# Altium PCB PCB-MAIN.PcbDoc (part 6 of 6)
Units mm, origin at the board's own origin, x right, y up, seen from the top; angles counter-clockwise.
Board outline 110 x 75 mm, 8 copper layers (F.Cu, In1.Cu, In2.Cu, In3.Cu, In4.Cu, In5.Cu, In6.Cu, B.Cu); 251 components, 185 nets, 1143 pads, 853 vias.
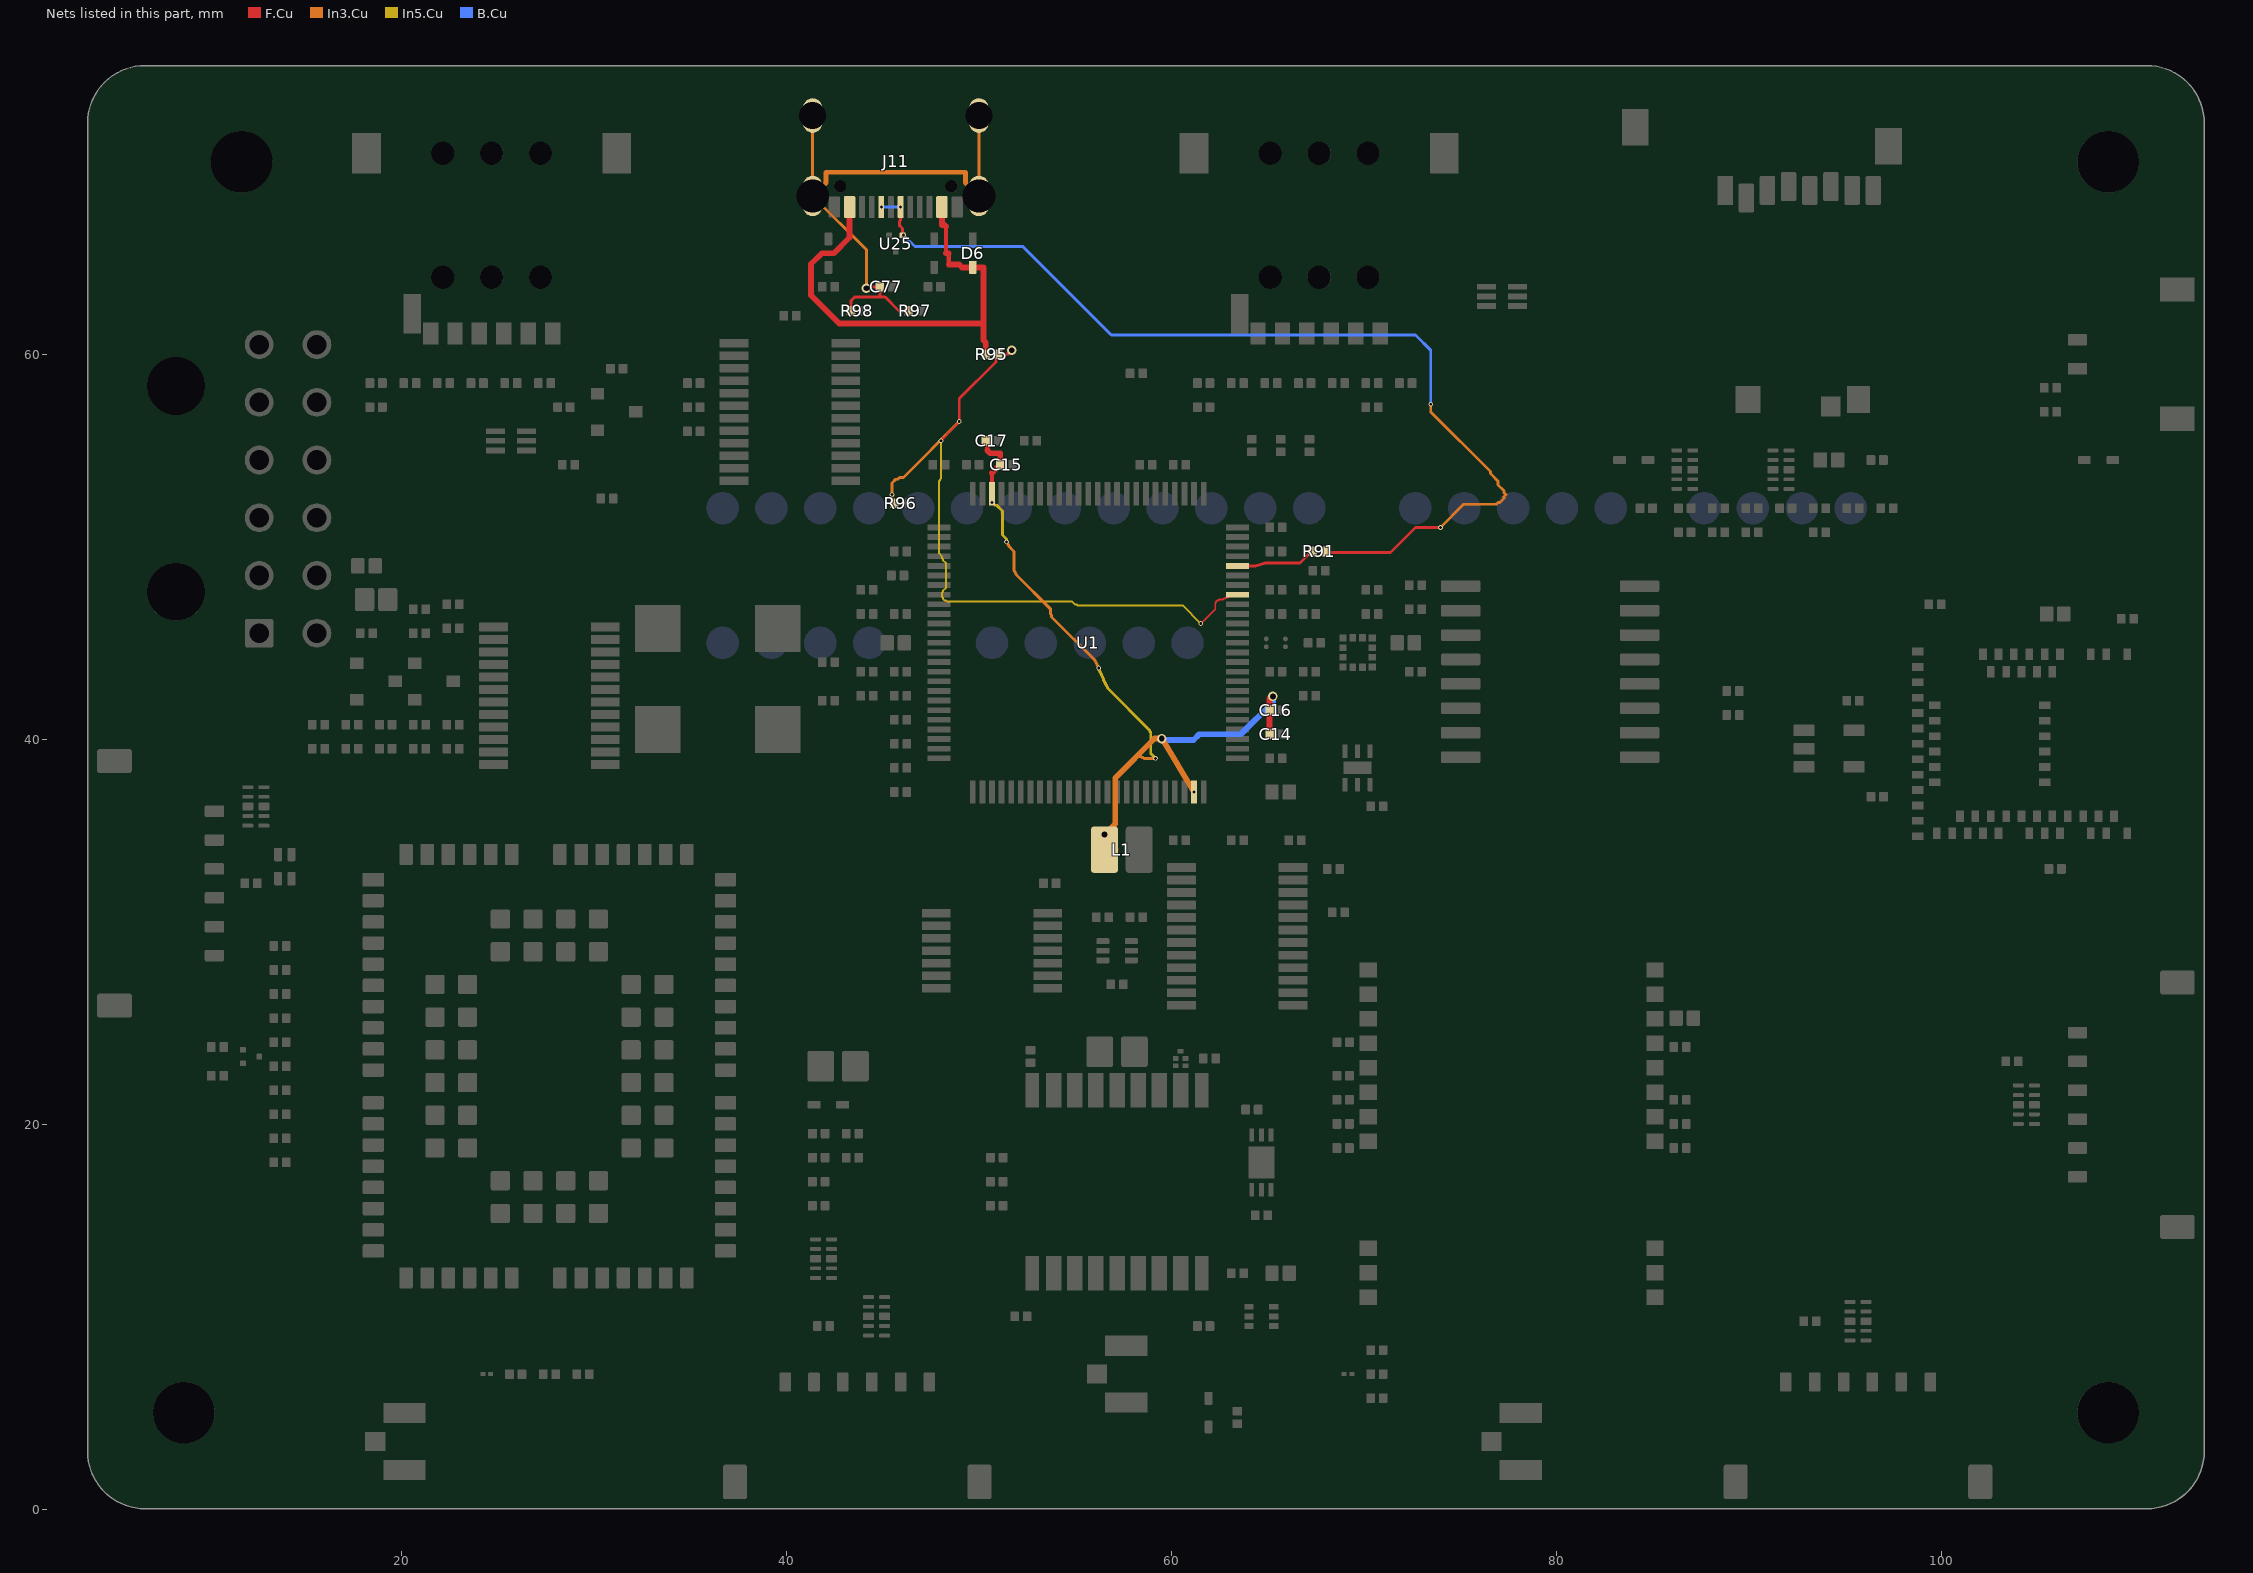
[diagram p11: the nets of this part, all layers, seen from the top]

## Via types
v1: diameter 0.5, hole 0.3, F.Cu to B.Cu, tented both sides, 579 vias
v2: diameter 0.25, hole 0.15, F.Cu to B.Cu, tented both sides, 274 vias

## Nets (pads, with @x,y where several pads share a name; then routed paths per layer and width w, separated by ;. In a path a pad name is that pad's centre, name@x,y a point inside that pad or via, vN(x,y) a via of type N, cw(c..) or ccw(c..) an arc to the next point about the centre after c; other vN are vias at no path point) (continued)
USB_DP_CONN: J11.A6 J11.B6 R91.2 U25.1 | length 52.2
  F.Cu w0.15: R91.2@68.085,49.725 71.385,49.725 72.685,51.025 v2(73.985,51.025)
  F.Cu w0.154: v2(45.935,67.67) 45.935,66.975 45.868,66.908 45.868,66.725 46.035,66.558 U25.1@46.035,66.2
  In3.Cu w0.15: v2(73.485,57.425) 73.485,57.025 76.585,53.925 76.585,53.825 76.985,53.425 76.985,53.225 77.285,52.925 77.285,52.825 77.385,52.725 77.285,52.625 77.285,52.525 77.085,52.325 76.985,52.325 76.885,52.225 75.185,52.225 v2(73.985,51.025)
  B.Cu w0.15: v2(46.085,66.225) 46.685,65.625 52.285,65.625 56.885,61.025 72.685,61.025 73.485,60.225 v2(73.485,57.425)
  B.Cu w0.154: v2(44.935,67.67) v2(45.935,67.67)
USB_DP_U1: R91.1 U1.71 | length 4.2
  F.Cu w0.154: U1.71@63.435,49.025 64.385,49.025 64.885,49.175 66.685,49.175 67.135,49.625 R91.1@67.36,49.775
USB_SHIELD: C77.1 J11.SHIELD R97.1 R98.1 | length 29.8
  F.Cu w0.15: R98.1@43.36,62.275 43.36,62.802 43.556,62.998 44.86,62.998 ; v1(44.159,63.449) 44.282,63.449 44.358,63.525 C77.1@44.86,63.525 44.86,62.998 ; R97.1@46.36,62.275 45.858,62.275 45.135,62.998 44.86,62.998
  In3.Cu w0.15: J11.SHIELD@41.365,72.425 J11.SHIELD@41.365,68.245 44.159,65.451 v1(44.159,63.449) ; J11.SHIELD@50.005,68.245 J11.SHIELD@50.005,72.425
  In3.Cu w0.25: J11.SHIELD@41.365,68.245 42.065,68.945 42.065,69.475 49.305,69.475 49.305,68.945 J11.SHIELD@50.005,68.245
USB_VBUS_CONN: D6.1 J11.A4 J11.A9 J11.B4 J11.B9 R95.1 | length 25.1
  F.Cu w0.225: 48.297,65.275 48.297,66.66 ; 48.435,64.683 48.435,65.275
  F.Cu w0.3: J11.B4@43.285,67.67 43.285,66.082 42.478,65.275 41.846,65.275 41.283,64.712 41.283,63.089 42.747,61.624 50.237,61.624 ; J11.B9@48.085,67.67 48.085,66.743 48.215,66.743 48.297,66.66 ; 48.297,65.275 48.435,65.275 ; 48.435,64.683 48.985,64.683 49.133,64.535 D6.1@49.685,64.535 50.237,64.535 50.237,61.624 ; R95.1@50.36,60.025 50.36,60.627 50.237,60.75 50.237,61.624
USB_VBUS_SENSE: R95.2 R96.1 U1.68 | length 37
  F.Cu w0.1: v2(48.035,55.525) 48.335,55.825 48.335,55.875 v2@48.935,56.475 ; v2(61.535,46.025) 62.285,46.775 62.285,47.075 62.335,47.125 62.335,47.175 62.385,47.225 62.435,47.225 62.485,47.275 62.685,47.275 62.735,47.325 62.785,47.325 62.835,47.375 62.935,47.375 U1.68@63.085,47.525
  F.Cu w0.15: v2(45.485,52.725) 45.485,52.525 45.585,52.425 R96.1@45.585,52.325 ; v2(48.985,56.525) 48.985,57.725 50.885,59.625 50.885,59.825 R95.2@50.985,59.925 ; R95.2@51.01,60.025 51.512,60.025 v1(51.712,60.225)
  In3.Cu w0.15: v2(45.485,52.725) 45.485,53.325 45.685,53.525 45.785,53.525 45.885,53.625 46.085,53.625 v2(48.985,56.525)
  In5.Cu w0.1: v2(48.035,55.525) 48.035,53.575 47.985,53.525 47.985,53.475 47.935,53.425 47.935,49.675 48.085,49.525 48.085,49.425 48.135,49.375 48.135,49.325 48.285,49.175 48.285,47.875 48.135,47.725 48.135,47.675 48.085,47.625 48.085,47.425 48.135,47.375 48.135,47.325 48.235,47.225 48.285,47.225 48.335,47.175 54.835,47.175 54.985,47.025 55.085,47.025 55.135,46.975 60.585,46.975 v2(61.535,46.025)
VCORE_1V1: C14.1 C15.1 C16.1 C17.1 L1.2 U1.49 U1.98 | length 41.4
  F.Cu w0.225: C17.1@50.36,55.525 50.434,55.451 50.434,55.028 ; U1.98@50.685,52.775 50.685,53.85
  F.Cu w0.3: 50.434,55.028 50.585,54.877 51.11,54.877 C15.1@51.11,54.275 50.685,53.85 ; v1(56.533,35.06) 56.533,34.275 L1.2@57.11,34.275 ; C14.1@65.11,40.275 C16.1@65.11,41.525 65.11,42.127 65.166,42.127 v1(65.281,42.242)
  In3.Cu w0.15: v2(51.435,50.275) 51.485,50.225 51.485,50.175 51.535,50.125 51.535,50.075 51.835,49.775 51.835,48.775 51.885,48.725 51.885,48.675 51.935,48.625 51.935,48.575 53.735,46.775 53.735,46.525 53.785,46.475 53.785,46.375 56.035,44.125 56.035,44.075 56.085,44.025 56.085,43.975 56.135,43.925 56.135,43.875 56.185,43.825 56.185,43.775 v2(56.235,43.725) ; 58.285,39.175 58.335,39.125 58.435,39.125 58.485,39.075 58.535,39.075 58.585,39.025 v2(59.185,39.025)
  In3.Cu w0.3: v1(56.533,35.06) 57.085,35.612 57.085,38.002 59.132,40.049 v1(59.509,40.049) v2(61.185,37.275)
  In5.Cu w0.15: v2(50.685,52.325) 50.835,52.175 50.935,52.175 51.235,51.875 51.235,50.625 51.435,50.425 v2(51.435,50.275) ; v2(56.235,43.725) 56.235,43.625 56.285,43.575 56.285,43.525 56.335,43.475 56.335,43.425 56.385,43.375 56.385,43.325 56.435,43.275 56.435,43.225 56.485,43.175 56.485,43.075 56.535,43.025 56.535,42.975 56.585,42.925 56.585,42.875 56.635,42.825 56.635,42.775 56.685,42.725 56.685,42.675 58.885,40.475 58.885,40.425 58.935,40.375 58.935,39.275 v2(59.185,39.025)
  B.Cu w0.3: v1(59.509,40.049) 59.583,39.974 61.16,39.974 61.457,40.272 63.613,40.272 65.281,41.94 v1(65.281,42.242)
pads on no net: D1.Un1 D1.Un2 D2.Un1 D2.Un2 H1.Un1 H2.Un1 H3.Un1 H4.Un1 J6.5 J6.Un1 J6.Un2 J6.Un3 J6.Un4 J6.Un5 J6.Un6 J7.5 J7.Un1 J7.Un2 J7.Un3 J7.Un4 J7.Un5 J7.Un6 J8.Un1 J8.Un2 J8.Un3 J9.Un1 J9.Un2 J9.Un3 J10.Un1 J10.Un2 J10.Un3 J11.A8 J11.B8 J11.Un1 J11.Un2 J13.Un1 J13.Un2 J_MIC1.Un1 J_MIC1.Un2 J_MIC2.Un1 J_MIC2.Un2 J_MIC3.Un1 J_MIC3.Un2 J_MIC4.Un1 J_MIC4.Un2 J_PWR.Un1 J_PWR.Un2 Q1.Un1 Q1.Un2 Q1.Un3 Q2.Un1 Q2.Un2 Q2.Un3 Q3.Un1 Q3.Un2 Q3.Un3 U1.9 U1.12 U1.13 U1.18 U1.23 U1.32 U1.36 U1.69 U1.84 U1.88 U1.89 U1.90 U1.91 U2.4 U2.5 U2.6 U2.11 U2.12 U2.13 U2.14 U3.5 U3.11 U4.2 U4.EP U6.1 U7.9 U7.10 U8.1 U8.2 U8.4 U8.5 U8.6 U8.7 U8.11 U8.12 U8.13 U8.14 U8.16 U8.18 U8.19 U8.21 U8.24 U8.25 U8.26 U8.27 U8.28 U8.36 U8.37 U8.38 U8.40 U8.41 U8.42 U8.49 U8.51 U8.56 U8.57 U8.63 U8.64 U8.65 U8.66 U8.76 U8.77 U8.78 U8.83 U8.84 U8.85 U8.86 U8.87 U8.88 U8.92 U8.93 U8.94 U8.95 U8.96 U8.97 U8.98 U8.99 U9.5 U9.6 U9.9 U9.15 U9.18 U10.8 U11.3 U11.4 U11.5 U11.6 U11.7 U11.8 U11.9 U11.10 U11.11 U11.12 U11.13 U11.14 U11.16 U11.17 U11.18 U11.19 U11.20 U11.21 U11.23 U11.25 U11.26 U11.27 U11.29 U11.31 U11.32 U11.34 U11.35 U11.36 U11.37 U11.38 U11.41 U11.42 U11.43 U11.44 U11.45 U11.46 U11.47 U11.48 U11.49 U11.50 U11.52 U11.54 U11.56 U11.57 U11.58 U11.59 U11.60 U11.61 U13.3 U16.9 U16.10 U16.18 U17.11 U19.6 U19.7 U19.9 U19.10 U19.Un1 U19.Un2 U20.6 U20.7 U20.9 U20.10 U20.Un1 U20.Un2 U21.6 U21.7 U21.9 U21.10 U21.Un1 U21.Un2 U22.6 U22.7 U22.9 U22.10 U22.Un1 U22.Un2 U23.6 U23.7 U23.9 U23.10 U23.Un1 U23.Un2 U24.5 U24.6 U24.7 U24.9 U24.10 U24.Un1 U24.Un2 U27.6 U27.7 U27.9 U27.10 U27.Un1 U27.Un2

## Polygon pours and split planes (outlines as drawn)
GND_MODEM on In1.Cu "In1.Cu-GND_MODEM" (solid, remove dead copper, pour order 8): 13.685,41.025 39.685,41.025 39.685,1.025 13.685,1.025
GND_DIGITAL on In1.Cu "In1.Cu-GND_DIGITAL" (solid, remove dead copper, pour order 5): 113.035,0.675 39.885,0.675 39.885,41.225 13.485,41.225 13.485,0.675 4.335,0.675 4.335,74.375 113.035,74.375
GND_MIC on In2.Cu "In2.Cu-GND_MIC" (solid, remove dead copper, pour order 9): 113.035,45.225 97.985,45.225 97.985,34.325 113.035,34.325 113.035,0.675 89.385,0.675 89.385,29.225 66.885,29.225 66.885,24.225 47.485,24.225 47.485,0.675 39.885,0.675 39.885,41.225 13.485,41.225 13.485,0.675 4.335,0.675 4.335,74.375 113.035,74.375
GND_DIGITAL on In4.Cu "In4.Cu-GND_DIGITAL" (solid, remove dead copper, pour order 10): 113.035,0.675 113.035,74.375 4.335,74.375 4.335,0.675 13.485,0.675 13.485,41.225 39.885,41.225 39.885,0.675
GND_MODEM on In4.Cu "In4.Cu-GND_MODEM-1" (solid, remove dead copper, pour order 7): 299 vertices, not listed, extent 8.612,0.675 79.488,72.125
GND_MODEM on In4.Cu "In4.Cu-GND_MODEM" (solid, remove dead copper, pour order 6): 59.694,45.365 59.645,45.042 59.665,44.808 59.73,44.582 59.838,44.373 59.985,44.189 60.164,44.037 60.37,43.923 60.594,43.852 60.828,43.825 61.062,43.845 61.288,43.91 61.497,44.018 61.681,44.165 61.833,44.344 61.947,44.55 62.018,44.774 62.045,45.042 61.988,45.39 61.849,45.681 61.619,45.941 61.395,46.091 61.062,46.205 60.744,46.221 60.461,46.161 60.304,46.378 60.044,46.51 59.81,46.516 59.591,46.433 59.424,46.276 59.331,46.083 59.312,45.883 59.363,45.68 59.498,45.489
GND_DIGITAL on In6.Cu "In6.Cu-GND_DIGITAL" (solid, remove dead copper, pour order 11): 113.035,0.675 113.035,74.375 4.335,74.375 4.335,0.675 13.485,0.675 13.485,41.225 39.885,41.225 39.885,0.675

## Keep-outs
F.Cu:
  region: 109.88,45.034 109.88,34.519 113.69,34.519 113.69,45.034
  region: 108.661,42.088 108.661,40.462 109.906,40.462 109.906,42.088
  region: 9.078,9.016 9.467,8.958 9.849,8.862 10.22,8.73 10.575,8.562 10.913,8.359 11.229,8.125 11.52,7.86 11.785,7.569 12.019,7.253 12.222,6.915 12.39,6.56 12.522,6.189 12.618,5.807 12.676,5.418 12.695,5.025 12.676,4.632 12.618,4.243 12.522,3.861 12.39,3.49 12.222,3.135 12.019,2.797 11.785,2.481 11.52,2.19 11.229,1.925 10.913,1.691 10.575,1.488 10.22,1.32 9.849,1.188 9.467,1.092 9.078,1.034 8.685,1.015 8.292,1.034 7.903,1.092 7.521,1.188 7.15,1.32 6.795,1.488 6.457,1.691 6.141,1.925 5.85,2.19 5.585,2.481 5.351,2.797 5.148,3.135 4.98,3.49 4.848,3.861 4.752,4.243 4.694,4.632 4.675,5.025 4.694,5.418 4.752,5.807 4.848,6.189 4.98,6.56 5.148,6.915 5.351,7.253 5.585,7.569 5.85,7.86 6.141,8.125 6.457,8.359 6.795,8.562 7.15,8.73 7.521,8.862 7.903,8.958 8.292,9.016 8.685,9.035
  region: 109.078,9.016 109.467,8.958 109.849,8.862 110.22,8.73 110.575,8.562 110.913,8.359 111.229,8.125 111.52,7.86 111.785,7.569 112.019,7.253 112.222,6.915 112.39,6.56 112.522,6.189 112.618,5.807 112.676,5.418 112.695,5.025 112.676,4.632 112.618,4.243 112.522,3.861 112.39,3.49 112.222,3.135 112.019,2.797 111.785,2.481 111.52,2.19 111.229,1.925 110.913,1.691 110.575,1.488 110.22,1.32 109.849,1.188 109.467,1.092 109.078,1.034 108.685,1.015 108.292,1.034 107.903,1.092 107.521,1.188 107.15,1.32 106.795,1.488 106.457,1.691 106.141,1.925 105.849,2.19 105.585,2.481 105.351,2.797 105.148,3.135 104.98,3.49 104.848,3.861 104.752,4.243 104.694,4.632 104.675,5.025 104.694,5.418 104.752,5.807 104.848,6.189 104.98,6.56 105.148,6.915 105.351,7.253 105.585,7.569 105.849,7.86 106.141,8.125 106.457,8.359 106.795,8.562 107.15,8.73 107.521,8.862 107.903,8.958 108.292,9.016 108.685,9.035
  region: 109.078,74.016 109.467,73.958 109.849,73.862 110.22,73.73 110.575,73.562 110.913,73.359 111.229,73.125 111.52,72.86 111.785,72.569 112.019,72.253 112.222,71.915 112.39,71.56 112.522,71.189 112.618,70.807 112.676,70.418 112.695,70.025 112.676,69.632 112.618,69.243 112.522,68.861 112.39,68.49 112.222,68.135 112.019,67.797 111.785,67.481 111.52,67.19 111.229,66.925 110.913,66.691 110.575,66.488 110.22,66.32 109.849,66.188 109.467,66.092 109.078,66.034 108.685,66.015 108.292,66.034 107.903,66.092 107.521,66.188 107.15,66.32 106.795,66.488 106.457,66.691 106.141,66.925 105.849,67.19 105.585,67.481 105.351,67.797 105.148,68.135 104.98,68.49 104.848,68.861 104.752,69.243 104.694,69.632 104.675,70.025 104.694,70.418 104.752,70.807 104.848,71.189 104.98,71.56 105.148,71.915 105.351,72.253 105.585,72.569 105.849,72.86 106.141,73.125 106.457,73.359 106.795,73.562 107.15,73.73 107.521,73.862 107.903,73.958 108.292,74.016 108.685,74.035
  region: 12.078,74.016 12.467,73.958 12.849,73.862 13.22,73.73 13.575,73.562 13.913,73.359 14.229,73.125 14.52,72.86 14.785,72.569 15.019,72.253 15.222,71.915 15.39,71.56 15.522,71.189 15.618,70.807 15.676,70.418 15.695,70.025 15.676,69.632 15.618,69.243 15.522,68.861 15.39,68.49 15.222,68.135 15.019,67.797 14.785,67.481 14.52,67.19 14.229,66.925 13.913,66.691 13.575,66.488 13.22,66.32 12.849,66.188 12.467,66.092 12.078,66.034 11.685,66.015 11.292,66.034 10.903,66.092 10.521,66.188 10.15,66.32 9.795,66.488 9.457,66.691 9.141,66.925 8.849,67.19 8.585,67.481 8.351,67.797 8.148,68.135 7.98,68.49 7.848,68.861 7.752,69.243 7.694,69.632 7.675,70.025 7.694,70.418 7.752,70.807 7.848,71.189 7.98,71.56 8.148,71.915 8.351,72.253 8.585,72.569 8.849,72.86 9.141,73.125 9.457,73.359 9.795,73.562 10.15,73.73 10.521,73.862 10.903,73.958 11.292,74.016 11.685,74.035
In1.Cu:
  region: 109.88,45.034 109.88,34.519 113.69,34.519 113.69,45.034
  region: 9.078,9.016 9.467,8.958 9.849,8.862 10.22,8.73 10.575,8.562 10.913,8.359 11.229,8.125 11.52,7.86 11.785,7.569 12.019,7.253 12.222,6.915 12.39,6.56 12.522,6.189 12.618,5.807 12.676,5.418 12.695,5.025 12.676,4.632 12.618,4.243 12.522,3.861 12.39,3.49 12.222,3.135 12.019,2.797 11.785,2.481 11.52,2.19 11.229,1.925 10.913,1.691 10.575,1.488 10.22,1.32 9.849,1.188 9.467,1.092 9.078,1.034 8.685,1.015 8.292,1.034 7.903,1.092 7.521,1.188 7.15,1.32 6.795,1.488 6.457,1.691 6.141,1.925 5.85,2.19 5.585,2.481 5.351,2.797 5.148,3.135 4.98,3.49 4.848,3.861 4.752,4.243 4.694,4.632 4.675,5.025 4.694,5.418 4.752,5.807 4.848,6.189 4.98,6.56 5.148,6.915 5.351,7.253 5.585,7.569 5.85,7.86 6.141,8.125 6.457,8.359 6.795,8.562 7.15,8.73 7.521,8.862 7.903,8.958 8.292,9.016 8.685,9.035
  region: 109.078,9.016 109.467,8.958 109.849,8.862 110.22,8.73 110.575,8.562 110.913,8.359 111.229,8.125 111.52,7.86 111.785,7.569 112.019,7.253 112.222,6.915 112.39,6.56 112.522,6.189 112.618,5.807 112.676,5.418 112.695,5.025 112.676,4.632 112.618,4.243 112.522,3.861 112.39,3.49 112.222,3.135 112.019,2.797 111.785,2.481 111.52,2.19 111.229,1.925 110.913,1.691 110.575,1.488 110.22,1.32 109.849,1.188 109.467,1.092 109.078,1.034 108.685,1.015 108.292,1.034 107.903,1.092 107.521,1.188 107.15,1.32 106.795,1.488 106.457,1.691 106.141,1.925 105.849,2.19 105.585,2.481 105.351,2.797 105.148,3.135 104.98,3.49 104.848,3.861 104.752,4.243 104.694,4.632 104.675,5.025 104.694,5.418 104.752,5.807 104.848,6.189 104.98,6.56 105.148,6.915 105.351,7.253 105.585,7.569 105.849,7.86 106.141,8.125 106.457,8.359 106.795,8.562 107.15,8.73 107.521,8.862 107.903,8.958 108.292,9.016 108.685,9.035
  region: 109.078,74.016 109.467,73.958 109.849,73.862 110.22,73.73 110.575,73.562 110.913,73.359 111.229,73.125 111.52,72.86 111.785,72.569 112.019,72.253 112.222,71.915 112.39,71.56 112.522,71.189 112.618,70.807 112.676,70.418 112.695,70.025 112.676,69.632 112.618,69.243 112.522,68.861 112.39,68.49 112.222,68.135 112.019,67.797 111.785,67.481 111.52,67.19 111.229,66.925 110.913,66.691 110.575,66.488 110.22,66.32 109.849,66.188 109.467,66.092 109.078,66.034 108.685,66.015 108.292,66.034 107.903,66.092 107.521,66.188 107.15,66.32 106.795,66.488 106.457,66.691 106.141,66.925 105.849,67.19 105.585,67.481 105.351,67.797 105.148,68.135 104.98,68.49 104.848,68.861 104.752,69.243 104.694,69.632 104.675,70.025 104.694,70.418 104.752,70.807 104.848,71.189 104.98,71.56 105.148,71.915 105.351,72.253 105.585,72.569 105.849,72.86 106.141,73.125 106.457,73.359 106.795,73.562 107.15,73.73 107.521,73.862 107.903,73.958 108.292,74.016 108.685,74.035
  region: 12.078,74.016 12.467,73.958 12.849,73.862 13.22,73.73 13.575,73.562 13.913,73.359 14.229,73.125 14.52,72.86 14.785,72.569 15.019,72.253 15.222,71.915 15.39,71.56 15.522,71.189 15.618,70.807 15.676,70.418 15.695,70.025 15.676,69.632 15.618,69.243 15.522,68.861 15.39,68.49 15.222,68.135 15.019,67.797 14.785,67.481 14.52,67.19 14.229,66.925 13.913,66.691 13.575,66.488 13.22,66.32 12.849,66.188 12.467,66.092 12.078,66.034 11.685,66.015 11.292,66.034 10.903,66.092 10.521,66.188 10.15,66.32 9.795,66.488 9.457,66.691 9.141,66.925 8.849,67.19 8.585,67.481 8.351,67.797 8.148,68.135 7.98,68.49 7.848,68.861 7.752,69.243 7.694,69.632 7.675,70.025 7.694,70.418 7.752,70.807 7.848,71.189 7.98,71.56 8.148,71.915 8.351,72.253 8.585,72.569 8.849,72.86 9.141,73.125 9.457,73.359 9.795,73.562 10.15,73.73 10.521,73.862 10.903,73.958 11.292,74.016 11.685,74.035
In2.Cu:
  region: 109.88,45.034 109.88,34.519 113.69,34.519 113.69,45.034
  region: 9.078,9.016 9.467,8.958 9.849,8.862 10.22,8.73 10.575,8.562 10.913,8.359 11.229,8.125 11.52,7.86 11.785,7.569 12.019,7.253 12.222,6.915 12.39,6.56 12.522,6.189 12.618,5.807 12.676,5.418 12.695,5.025 12.676,4.632 12.618,4.243 12.522,3.861 12.39,3.49 12.222,3.135 12.019,2.797 11.785,2.481 11.52,2.19 11.229,1.925 10.913,1.691 10.575,1.488 10.22,1.32 9.849,1.188 9.467,1.092 9.078,1.034 8.685,1.015 8.292,1.034 7.903,1.092 7.521,1.188 7.15,1.32 6.795,1.488 6.457,1.691 6.141,1.925 5.85,2.19 5.585,2.481 5.351,2.797 5.148,3.135 4.98,3.49 4.848,3.861 4.752,4.243 4.694,4.632 4.675,5.025 4.694,5.418 4.752,5.807 4.848,6.189 4.98,6.56 5.148,6.915 5.351,7.253 5.585,7.569 5.85,7.86 6.141,8.125 6.457,8.359 6.795,8.562 7.15,8.73 7.521,8.862 7.903,8.958 8.292,9.016 8.685,9.035
  region: 109.078,9.016 109.467,8.958 109.849,8.862 110.22,8.73 110.575,8.562 110.913,8.359 111.229,8.125 111.52,7.86 111.785,7.569 112.019,7.253 112.222,6.915 112.39,6.56 112.522,6.189 112.618,5.807 112.676,5.418 112.695,5.025 112.676,4.632 112.618,4.243 112.522,3.861 112.39,3.49 112.222,3.135 112.019,2.797 111.785,2.481 111.52,2.19 111.229,1.925 110.913,1.691 110.575,1.488 110.22,1.32 109.849,1.188 109.467,1.092 109.078,1.034 108.685,1.015 108.292,1.034 107.903,1.092 107.521,1.188 107.15,1.32 106.795,1.488 106.457,1.691 106.141,1.925 105.849,2.19 105.585,2.481 105.351,2.797 105.148,3.135 104.98,3.49 104.848,3.861 104.752,4.243 104.694,4.632 104.675,5.025 104.694,5.418 104.752,5.807 104.848,6.189 104.98,6.56 105.148,6.915 105.351,7.253 105.585,7.569 105.849,7.86 106.141,8.125 106.457,8.359 106.795,8.562 107.15,8.73 107.521,8.862 107.903,8.958 108.292,9.016 108.685,9.035
  region: 109.078,74.016 109.467,73.958 109.849,73.862 110.22,73.73 110.575,73.562 110.913,73.359 111.229,73.125 111.52,72.86 111.785,72.569 112.019,72.253 112.222,71.915 112.39,71.56 112.522,71.189 112.618,70.807 112.676,70.418 112.695,70.025 112.676,69.632 112.618,69.243 112.522,68.861 112.39,68.49 112.222,68.135 112.019,67.797 111.785,67.481 111.52,67.19 111.229,66.925 110.913,66.691 110.575,66.488 110.22,66.32 109.849,66.188 109.467,66.092 109.078,66.034 108.685,66.015 108.292,66.034 107.903,66.092 107.521,66.188 107.15,66.32 106.795,66.488 106.457,66.691 106.141,66.925 105.849,67.19 105.585,67.481 105.351,67.797 105.148,68.135 104.98,68.49 104.848,68.861 104.752,69.243 104.694,69.632 104.675,70.025 104.694,70.418 104.752,70.807 104.848,71.189 104.98,71.56 105.148,71.915 105.351,72.253 105.585,72.569 105.849,72.86 106.141,73.125 106.457,73.359 106.795,73.562 107.15,73.73 107.521,73.862 107.903,73.958 108.292,74.016 108.685,74.035
  region: 12.078,74.016 12.467,73.958 12.849,73.862 13.22,73.73 13.575,73.562 13.913,73.359 14.229,73.125 14.52,72.86 14.785,72.569 15.019,72.253 15.222,71.915 15.39,71.56 15.522,71.189 15.618,70.807 15.676,70.418 15.695,70.025 15.676,69.632 15.618,69.243 15.522,68.861 15.39,68.49 15.222,68.135 15.019,67.797 14.785,67.481 14.52,67.19 14.229,66.925 13.913,66.691 13.575,66.488 13.22,66.32 12.849,66.188 12.467,66.092 12.078,66.034 11.685,66.015 11.292,66.034 10.903,66.092 10.521,66.188 10.15,66.32 9.795,66.488 9.457,66.691 9.141,66.925 8.849,67.19 8.585,67.481 8.351,67.797 8.148,68.135 7.98,68.49 7.848,68.861 7.752,69.243 7.694,69.632 7.675,70.025 7.694,70.418 7.752,70.807 7.848,71.189 7.98,71.56 8.148,71.915 8.351,72.253 8.585,72.569 8.849,72.86 9.141,73.125 9.457,73.359 9.795,73.562 10.15,73.73 10.521,73.862 10.903,73.958 11.292,74.016 11.685,74.035
In3.Cu:
  region: 109.88,45.034 109.88,34.519 113.69,34.519 113.69,45.034
  region: 9.078,9.016 9.467,8.958 9.849,8.862 10.22,8.73 10.575,8.562 10.913,8.359 11.229,8.125 11.52,7.86 11.785,7.569 12.019,7.253 12.222,6.915 12.39,6.56 12.522,6.189 12.618,5.807 12.676,5.418 12.695,5.025 12.676,4.632 12.618,4.243 12.522,3.861 12.39,3.49 12.222,3.135 12.019,2.797 11.785,2.481 11.52,2.19 11.229,1.925 10.913,1.691 10.575,1.488 10.22,1.32 9.849,1.188 9.467,1.092 9.078,1.034 8.685,1.015 8.292,1.034 7.903,1.092 7.521,1.188 7.15,1.32 6.795,1.488 6.457,1.691 6.141,1.925 5.85,2.19 5.585,2.481 5.351,2.797 5.148,3.135 4.98,3.49 4.848,3.861 4.752,4.243 4.694,4.632 4.675,5.025 4.694,5.418 4.752,5.807 4.848,6.189 4.98,6.56 5.148,6.915 5.351,7.253 5.585,7.569 5.85,7.86 6.141,8.125 6.457,8.359 6.795,8.562 7.15,8.73 7.521,8.862 7.903,8.958 8.292,9.016 8.685,9.035
  region: 109.078,9.016 109.467,8.958 109.849,8.862 110.22,8.73 110.575,8.562 110.913,8.359 111.229,8.125 111.52,7.86 111.785,7.569 112.019,7.253 112.222,6.915 112.39,6.56 112.522,6.189 112.618,5.807 112.676,5.418 112.695,5.025 112.676,4.632 112.618,4.243 112.522,3.861 112.39,3.49 112.222,3.135 112.019,2.797 111.785,2.481 111.52,2.19 111.229,1.925 110.913,1.691 110.575,1.488 110.22,1.32 109.849,1.188 109.467,1.092 109.078,1.034 108.685,1.015 108.292,1.034 107.903,1.092 107.521,1.188 107.15,1.32 106.795,1.488 106.457,1.691 106.141,1.925 105.849,2.19 105.585,2.481 105.351,2.797 105.148,3.135 104.98,3.49 104.848,3.861 104.752,4.243 104.694,4.632 104.675,5.025 104.694,5.418 104.752,5.807 104.848,6.189 104.98,6.56 105.148,6.915 105.351,7.253 105.585,7.569 105.849,7.86 106.141,8.125 106.457,8.359 106.795,8.562 107.15,8.73 107.521,8.862 107.903,8.958 108.292,9.016 108.685,9.035
  region: 109.078,74.016 109.467,73.958 109.849,73.862 110.22,73.73 110.575,73.562 110.913,73.359 111.229,73.125 111.52,72.86 111.785,72.569 112.019,72.253 112.222,71.915 112.39,71.56 112.522,71.189 112.618,70.807 112.676,70.418 112.695,70.025 112.676,69.632 112.618,69.243 112.522,68.861 112.39,68.49 112.222,68.135 112.019,67.797 111.785,67.481 111.52,67.19 111.229,66.925 110.913,66.691 110.575,66.488 110.22,66.32 109.849,66.188 109.467,66.092 109.078,66.034 108.685,66.015 108.292,66.034 107.903,66.092 107.521,66.188 107.15,66.32 106.795,66.488 106.457,66.691 106.141,66.925 105.849,67.19 105.585,67.481 105.351,67.797 105.148,68.135 104.98,68.49 104.848,68.861 104.752,69.243 104.694,69.632 104.675,70.025 104.694,70.418 104.752,70.807 104.848,71.189 104.98,71.56 105.148,71.915 105.351,72.253 105.585,72.569 105.849,72.86 106.141,73.125 106.457,73.359 106.795,73.562 107.15,73.73 107.521,73.862 107.903,73.958 108.292,74.016 108.685,74.035
  region: 12.078,74.016 12.467,73.958 12.849,73.862 13.22,73.73 13.575,73.562 13.913,73.359 14.229,73.125 14.52,72.86 14.785,72.569 15.019,72.253 15.222,71.915 15.39,71.56 15.522,71.189 15.618,70.807 15.676,70.418 15.695,70.025 15.676,69.632 15.618,69.243 15.522,68.861 15.39,68.49 15.222,68.135 15.019,67.797 14.785,67.481 14.52,67.19 14.229,66.925 13.913,66.691 13.575,66.488 13.22,66.32 12.849,66.188 12.467,66.092 12.078,66.034 11.685,66.015 11.292,66.034 10.903,66.092 10.521,66.188 10.15,66.32 9.795,66.488 9.457,66.691 9.141,66.925 8.849,67.19 8.585,67.481 8.351,67.797 8.148,68.135 7.98,68.49 7.848,68.861 7.752,69.243 7.694,69.632 7.675,70.025 7.694,70.418 7.752,70.807 7.848,71.189 7.98,71.56 8.148,71.915 8.351,72.253 8.585,72.569 8.849,72.86 9.141,73.125 9.457,73.359 9.795,73.562 10.15,73.73 10.521,73.862 10.903,73.958 11.292,74.016 11.685,74.035
In4.Cu:
  region: 109.88,45.034 109.88,34.519 113.69,34.519 113.69,45.034
  region: 9.078,9.016 9.467,8.958 9.849,8.862 10.22,8.73 10.575,8.562 10.913,8.359 11.229,8.125 11.52,7.86 11.785,7.569 12.019,7.253 12.222,6.915 12.39,6.56 12.522,6.189 12.618,5.807 12.676,5.418 12.695,5.025 12.676,4.632 12.618,4.243 12.522,3.861 12.39,3.49 12.222,3.135 12.019,2.797 11.785,2.481 11.52,2.19 11.229,1.925 10.913,1.691 10.575,1.488 10.22,1.32 9.849,1.188 9.467,1.092 9.078,1.034 8.685,1.015 8.292,1.034 7.903,1.092 7.521,1.188 7.15,1.32 6.795,1.488 6.457,1.691 6.141,1.925 5.85,2.19 5.585,2.481 5.351,2.797 5.148,3.135 4.98,3.49 4.848,3.861 4.752,4.243 4.694,4.632 4.675,5.025 4.694,5.418 4.752,5.807 4.848,6.189 4.98,6.56 5.148,6.915 5.351,7.253 5.585,7.569 5.85,7.86 6.141,8.125 6.457,8.359 6.795,8.562 7.15,8.73 7.521,8.862 7.903,8.958 8.292,9.016 8.685,9.035
  region: 109.078,9.016 109.467,8.958 109.849,8.862 110.22,8.73 110.575,8.562 110.913,8.359 111.229,8.125 111.52,7.86 111.785,7.569 112.019,7.253 112.222,6.915 112.39,6.56 112.522,6.189 112.618,5.807 112.676,5.418 112.695,5.025 112.676,4.632 112.618,4.243 112.522,3.861 112.39,3.49 112.222,3.135 112.019,2.797 111.785,2.481 111.52,2.19 111.229,1.925 110.913,1.691 110.575,1.488 110.22,1.32 109.849,1.188 109.467,1.092 109.078,1.034 108.685,1.015 108.292,1.034 107.903,1.092 107.521,1.188 107.15,1.32 106.795,1.488 106.457,1.691 106.141,1.925 105.849,2.19 105.585,2.481 105.351,2.797 105.148,3.135 104.98,3.49 104.848,3.861 104.752,4.243 104.694,4.632 104.675,5.025 104.694,5.418 104.752,5.807 104.848,6.189 104.98,6.56 105.148,6.915 105.351,7.253 105.585,7.569 105.849,7.86 106.141,8.125 106.457,8.359 106.795,8.562 107.15,8.73 107.521,8.862 107.903,8.958 108.292,9.016 108.685,9.035
  region: 109.078,74.016 109.467,73.958 109.849,73.862 110.22,73.73 110.575,73.562 110.913,73.359 111.229,73.125 111.52,72.86 111.785,72.569 112.019,72.253 112.222,71.915 112.39,71.56 112.522,71.189 112.618,70.807 112.676,70.418 112.695,70.025 112.676,69.632 112.618,69.243 112.522,68.861 112.39,68.49 112.222,68.135 112.019,67.797 111.785,67.481 111.52,67.19 111.229,66.925 110.913,66.691 110.575,66.488 110.22,66.32 109.849,66.188 109.467,66.092 109.078,66.034 108.685,66.015 108.292,66.034 107.903,66.092 107.521,66.188 107.15,66.32 106.795,66.488 106.457,66.691 106.141,66.925 105.849,67.19 105.585,67.481 105.351,67.797 105.148,68.135 104.98,68.49 104.848,68.861 104.752,69.243 104.694,69.632 104.675,70.025 104.694,70.418 104.752,70.807 104.848,71.189 104.98,71.56 105.148,71.915 105.351,72.253 105.585,72.569 105.849,72.86 106.141,73.125 106.457,73.359 106.795,73.562 107.15,73.73 107.521,73.862 107.903,73.958 108.292,74.016 108.685,74.035
  region: 12.078,74.016 12.467,73.958 12.849,73.862 13.22,73.73 13.575,73.562 13.913,73.359 14.229,73.125 14.52,72.86 14.785,72.569 15.019,72.253 15.222,71.915 15.39,71.56 15.522,71.189 15.618,70.807 15.676,70.418 15.695,70.025 15.676,69.632 15.618,69.243 15.522,68.861 15.39,68.49 15.222,68.135 15.019,67.797 14.785,67.481 14.52,67.19 14.229,66.925 13.913,66.691 13.575,66.488 13.22,66.32 12.849,66.188 12.467,66.092 12.078,66.034 11.685,66.015 11.292,66.034 10.903,66.092 10.521,66.188 10.15,66.32 9.795,66.488 9.457,66.691 9.141,66.925 8.849,67.19 8.585,67.481 8.351,67.797 8.148,68.135 7.98,68.49 7.848,68.861 7.752,69.243 7.694,69.632 7.675,70.025 7.694,70.418 7.752,70.807 7.848,71.189 7.98,71.56 8.148,71.915 8.351,72.253 8.585,72.569 8.849,72.86 9.141,73.125 9.457,73.359 9.795,73.562 10.15,73.73 10.521,73.862 10.903,73.958 11.292,74.016 11.685,74.035
In5.Cu:
  region: 109.88,45.034 109.88,34.519 113.69,34.519 113.69,45.034
  region: 9.078,9.016 9.467,8.958 9.849,8.862 10.22,8.73 10.575,8.562 10.913,8.359 11.229,8.125 11.52,7.86 11.785,7.569 12.019,7.253 12.222,6.915 12.39,6.56 12.522,6.189 12.618,5.807 12.676,5.418 12.695,5.025 12.676,4.632 12.618,4.243 12.522,3.861 12.39,3.49 12.222,3.135 12.019,2.797 11.785,2.481 11.52,2.19 11.229,1.925 10.913,1.691 10.575,1.488 10.22,1.32 9.849,1.188 9.467,1.092 9.078,1.034 8.685,1.015 8.292,1.034 7.903,1.092 7.521,1.188 7.15,1.32 6.795,1.488 6.457,1.691 6.141,1.925 5.85,2.19 5.585,2.481 5.351,2.797 5.148,3.135 4.98,3.49 4.848,3.861 4.752,4.243 4.694,4.632 4.675,5.025 4.694,5.418 4.752,5.807 4.848,6.189 4.98,6.56 5.148,6.915 5.351,7.253 5.585,7.569 5.85,7.86 6.141,8.125 6.457,8.359 6.795,8.562 7.15,8.73 7.521,8.862 7.903,8.958 8.292,9.016 8.685,9.035
  region: 109.078,9.016 109.467,8.958 109.849,8.862 110.22,8.73 110.575,8.562 110.913,8.359 111.229,8.125 111.52,7.86 111.785,7.569 112.019,7.253 112.222,6.915 112.39,6.56 112.522,6.189 112.618,5.807 112.676,5.418 112.695,5.025 112.676,4.632 112.618,4.243 112.522,3.861 112.39,3.49 112.222,3.135 112.019,2.797 111.785,2.481 111.52,2.19 111.229,1.925 110.913,1.691 110.575,1.488 110.22,1.32 109.849,1.188 109.467,1.092 109.078,1.034 108.685,1.015 108.292,1.034 107.903,1.092 107.521,1.188 107.15,1.32 106.795,1.488 106.457,1.691 106.141,1.925 105.849,2.19 105.585,2.481 105.351,2.797 105.148,3.135 104.98,3.49 104.848,3.861 104.752,4.243 104.694,4.632 104.675,5.025 104.694,5.418 104.752,5.807 104.848,6.189 104.98,6.56 105.148,6.915 105.351,7.253 105.585,7.569 105.849,7.86 106.141,8.125 106.457,8.359 106.795,8.562 107.15,8.73 107.521,8.862 107.903,8.958 108.292,9.016 108.685,9.035
  region: 109.078,74.016 109.467,73.958 109.849,73.862 110.22,73.73 110.575,73.562 110.913,73.359 111.229,73.125 111.52,72.86 111.785,72.569 112.019,72.253 112.222,71.915 112.39,71.56 112.522,71.189 112.618,70.807 112.676,70.418 112.695,70.025 112.676,69.632 112.618,69.243 112.522,68.861 112.39,68.49 112.222,68.135 112.019,67.797 111.785,67.481 111.52,67.19 111.229,66.925 110.913,66.691 110.575,66.488 110.22,66.32 109.849,66.188 109.467,66.092 109.078,66.034 108.685,66.015 108.292,66.034 107.903,66.092 107.521,66.188 107.15,66.32 106.795,66.488 106.457,66.691 106.141,66.925 105.849,67.19 105.585,67.481 105.351,67.797 105.148,68.135 104.98,68.49 104.848,68.861 104.752,69.243 104.694,69.632 104.675,70.025 104.694,70.418 104.752,70.807 104.848,71.189 104.98,71.56 105.148,71.915 105.351,72.253 105.585,72.569 105.849,72.86 106.141,73.125 106.457,73.359 106.795,73.562 107.15,73.73 107.521,73.862 107.903,73.958 108.292,74.016 108.685,74.035
  region: 12.078,74.016 12.467,73.958 12.849,73.862 13.22,73.73 13.575,73.562 13.913,73.359 14.229,73.125 14.52,72.86 14.785,72.569 15.019,72.253 15.222,71.915 15.39,71.56 15.522,71.189 15.618,70.807 15.676,70.418 15.695,70.025 15.676,69.632 15.618,69.243 15.522,68.861 15.39,68.49 15.222,68.135 15.019,67.797 14.785,67.481 14.52,67.19 14.229,66.925 13.913,66.691 13.575,66.488 13.22,66.32 12.849,66.188 12.467,66.092 12.078,66.034 11.685,66.015 11.292,66.034 10.903,66.092 10.521,66.188 10.15,66.32 9.795,66.488 9.457,66.691 9.141,66.925 8.849,67.19 8.585,67.481 8.351,67.797 8.148,68.135 7.98,68.49 7.848,68.861 7.752,69.243 7.694,69.632 7.675,70.025 7.694,70.418 7.752,70.807 7.848,71.189 7.98,71.56 8.148,71.915 8.351,72.253 8.585,72.569 8.849,72.86 9.141,73.125 9.457,73.359 9.795,73.562 10.15,73.73 10.521,73.862 10.903,73.958 11.292,74.016 11.685,74.035
In6.Cu:
  region: 109.88,45.034 109.88,34.519 113.69,34.519 113.69,45.034
  region: 9.078,9.016 9.467,8.958 9.849,8.862 10.22,8.73 10.575,8.562 10.913,8.359 11.229,8.125 11.52,7.86 11.785,7.569 12.019,7.253 12.222,6.915 12.39,6.56 12.522,6.189 12.618,5.807 12.676,5.418 12.695,5.025 12.676,4.632 12.618,4.243 12.522,3.861 12.39,3.49 12.222,3.135 12.019,2.797 11.785,2.481 11.52,2.19 11.229,1.925 10.913,1.691 10.575,1.488 10.22,1.32 9.849,1.188 9.467,1.092 9.078,1.034 8.685,1.015 8.292,1.034 7.903,1.092 7.521,1.188 7.15,1.32 6.795,1.488 6.457,1.691 6.141,1.925 5.85,2.19 5.585,2.481 5.351,2.797 5.148,3.135 4.98,3.49 4.848,3.861 4.752,4.243 4.694,4.632 4.675,5.025 4.694,5.418 4.752,5.807 4.848,6.189 4.98,6.56 5.148,6.915 5.351,7.253 5.585,7.569 5.85,7.86 6.141,8.125 6.457,8.359 6.795,8.562 7.15,8.73 7.521,8.862 7.903,8.958 8.292,9.016 8.685,9.035
  region: 109.078,9.016 109.467,8.958 109.849,8.862 110.22,8.73 110.575,8.562 110.913,8.359 111.229,8.125 111.52,7.86 111.785,7.569 112.019,7.253 112.222,6.915 112.39,6.56 112.522,6.189 112.618,5.807 112.676,5.418 112.695,5.025 112.676,4.632 112.618,4.243 112.522,3.861 112.39,3.49 112.222,3.135 112.019,2.797 111.785,2.481 111.52,2.19 111.229,1.925 110.913,1.691 110.575,1.488 110.22,1.32 109.849,1.188 109.467,1.092 109.078,1.034 108.685,1.015 108.292,1.034 107.903,1.092 107.521,1.188 107.15,1.32 106.795,1.488 106.457,1.691 106.141,1.925 105.849,2.19 105.585,2.481 105.351,2.797 105.148,3.135 104.98,3.49 104.848,3.861 104.752,4.243 104.694,4.632 104.675,5.025 104.694,5.418 104.752,5.807 104.848,6.189 104.98,6.56 105.148,6.915 105.351,7.253 105.585,7.569 105.849,7.86 106.141,8.125 106.457,8.359 106.795,8.562 107.15,8.73 107.521,8.862 107.903,8.958 108.292,9.016 108.685,9.035
  region: 109.078,74.016 109.467,73.958 109.849,73.862 110.22,73.73 110.575,73.562 110.913,73.359 111.229,73.125 111.52,72.86 111.785,72.569 112.019,72.253 112.222,71.915 112.39,71.56 112.522,71.189 112.618,70.807 112.676,70.418 112.695,70.025 112.676,69.632 112.618,69.243 112.522,68.861 112.39,68.49 112.222,68.135 112.019,67.797 111.785,67.481 111.52,67.19 111.229,66.925 110.913,66.691 110.575,66.488 110.22,66.32 109.849,66.188 109.467,66.092 109.078,66.034 108.685,66.015 108.292,66.034 107.903,66.092 107.521,66.188 107.15,66.32 106.795,66.488 106.457,66.691 106.141,66.925 105.849,67.19 105.585,67.481 105.351,67.797 105.148,68.135 104.98,68.49 104.848,68.861 104.752,69.243 104.694,69.632 104.675,70.025 104.694,70.418 104.752,70.807 104.848,71.189 104.98,71.56 105.148,71.915 105.351,72.253 105.585,72.569 105.849,72.86 106.141,73.125 106.457,73.359 106.795,73.562 107.15,73.73 107.521,73.862 107.903,73.958 108.292,74.016 108.685,74.035
  region: 12.078,74.016 12.467,73.958 12.849,73.862 13.22,73.73 13.575,73.562 13.913,73.359 14.229,73.125 14.52,72.86 14.785,72.569 15.019,72.253 15.222,71.915 15.39,71.56 15.522,71.189 15.618,70.807 15.676,70.418 15.695,70.025 15.676,69.632 15.618,69.243 15.522,68.861 15.39,68.49 15.222,68.135 15.019,67.797 14.785,67.481 14.52,67.19 14.229,66.925 13.913,66.691 13.575,66.488 13.22,66.32 12.849,66.188 12.467,66.092 12.078,66.034 11.685,66.015 11.292,66.034 10.903,66.092 10.521,66.188 10.15,66.32 9.795,66.488 9.457,66.691 9.141,66.925 8.849,67.19 8.585,67.481 8.351,67.797 8.148,68.135 7.98,68.49 7.848,68.861 7.752,69.243 7.694,69.632 7.675,70.025 7.694,70.418 7.752,70.807 7.848,71.189 7.98,71.56 8.148,71.915 8.351,72.253 8.585,72.569 8.849,72.86 9.141,73.125 9.457,73.359 9.795,73.562 10.15,73.73 10.521,73.862 10.903,73.958 11.292,74.016 11.685,74.035
B.Cu:
  region: 109.88,45.034 109.88,34.519 113.69,34.519 113.69,45.034
  region: 9.078,9.016 9.467,8.958 9.849,8.862 10.22,8.73 10.575,8.562 10.913,8.359 11.229,8.125 11.52,7.86 11.785,7.569 12.019,7.253 12.222,6.915 12.39,6.56 12.522,6.189 12.618,5.807 12.676,5.418 12.695,5.025 12.676,4.632 12.618,4.243 12.522,3.861 12.39,3.49 12.222,3.135 12.019,2.797 11.785,2.481 11.52,2.19 11.229,1.925 10.913,1.691 10.575,1.488 10.22,1.32 9.849,1.188 9.467,1.092 9.078,1.034 8.685,1.015 8.292,1.034 7.903,1.092 7.521,1.188 7.15,1.32 6.795,1.488 6.457,1.691 6.141,1.925 5.85,2.19 5.585,2.481 5.351,2.797 5.148,3.135 4.98,3.49 4.848,3.861 4.752,4.243 4.694,4.632 4.675,5.025 4.694,5.418 4.752,5.807 4.848,6.189 4.98,6.56 5.148,6.915 5.351,7.253 5.585,7.569 5.85,7.86 6.141,8.125 6.457,8.359 6.795,8.562 7.15,8.73 7.521,8.862 7.903,8.958 8.292,9.016 8.685,9.035
  region: 109.078,9.016 109.467,8.958 109.849,8.862 110.22,8.73 110.575,8.562 110.913,8.359 111.229,8.125 111.52,7.86 111.785,7.569 112.019,7.253 112.222,6.915 112.39,6.56 112.522,6.189 112.618,5.807 112.676,5.418 112.695,5.025 112.676,4.632 112.618,4.243 112.522,3.861 112.39,3.49 112.222,3.135 112.019,2.797 111.785,2.481 111.52,2.19 111.229,1.925 110.913,1.691 110.575,1.488 110.22,1.32 109.849,1.188 109.467,1.092 109.078,1.034 108.685,1.015 108.292,1.034 107.903,1.092 107.521,1.188 107.15,1.32 106.795,1.488 106.457,1.691 106.141,1.925 105.849,2.19 105.585,2.481 105.351,2.797 105.148,3.135 104.98,3.49 104.848,3.861 104.752,4.243 104.694,4.632 104.675,5.025 104.694,5.418 104.752,5.807 104.848,6.189 104.98,6.56 105.148,6.915 105.351,7.253 105.585,7.569 105.849,7.86 106.141,8.125 106.457,8.359 106.795,8.562 107.15,8.73 107.521,8.862 107.903,8.958 108.292,9.016 108.685,9.035
  region: 109.078,74.016 109.467,73.958 109.849,73.862 110.22,73.73 110.575,73.562 110.913,73.359 111.229,73.125 111.52,72.86 111.785,72.569 112.019,72.253 112.222,71.915 112.39,71.56 112.522,71.189 112.618,70.807 112.676,70.418 112.695,70.025 112.676,69.632 112.618,69.243 112.522,68.861 112.39,68.49 112.222,68.135 112.019,67.797 111.785,67.481 111.52,67.19 111.229,66.925 110.913,66.691 110.575,66.488 110.22,66.32 109.849,66.188 109.467,66.092 109.078,66.034 108.685,66.015 108.292,66.034 107.903,66.092 107.521,66.188 107.15,66.32 106.795,66.488 106.457,66.691 106.141,66.925 105.849,67.19 105.585,67.481 105.351,67.797 105.148,68.135 104.98,68.49 104.848,68.861 104.752,69.243 104.694,69.632 104.675,70.025 104.694,70.418 104.752,70.807 104.848,71.189 104.98,71.56 105.148,71.915 105.351,72.253 105.585,72.569 105.849,72.86 106.141,73.125 106.457,73.359 106.795,73.562 107.15,73.73 107.521,73.862 107.903,73.958 108.292,74.016 108.685,74.035
  region: 12.078,74.016 12.467,73.958 12.849,73.862 13.22,73.73 13.575,73.562 13.913,73.359 14.229,73.125 14.52,72.86 14.785,72.569 15.019,72.253 15.222,71.915 15.39,71.56 15.522,71.189 15.618,70.807 15.676,70.418 15.695,70.025 15.676,69.632 15.618,69.243 15.522,68.861 15.39,68.49 15.222,68.135 15.019,67.797 14.785,67.481 14.52,67.19 14.229,66.925 13.913,66.691 13.575,66.488 13.22,66.32 12.849,66.188 12.467,66.092 12.078,66.034 11.685,66.015 11.292,66.034 10.903,66.092 10.521,66.188 10.15,66.32 9.795,66.488 9.457,66.691 9.141,66.925 8.849,67.19 8.585,67.481 8.351,67.797 8.148,68.135 7.98,68.49 7.848,68.861 7.752,69.243 7.694,69.632 7.675,70.025 7.694,70.418 7.752,70.807 7.848,71.189 7.98,71.56 8.148,71.915 8.351,72.253 8.585,72.569 8.849,72.86 9.141,73.125 9.457,73.359 9.795,73.562 10.15,73.73 10.521,73.862 10.903,73.958 11.292,74.016 11.685,74.035
Edge.Cuts:
  lines w0: 3.685,3.025 ccw(c6.686,3.026) 6.685,0.025 110.685,0.025 ccw(c110.684,3.026) 113.685,3.025 113.685,72.025 ccw(c110.684,72.024) 110.685,75.025 6.685,75.025 ccw(c6.686,72.024) 3.685,72.025 3.685,3.025
  lines w0.254: 3.685,3.025 ccw(c6.686,3.026) 6.685,0.025 110.685,0.025 ccw(c110.684,3.026) 113.685,3.025 113.685,72.025 ccw(c110.684,72.024) 110.685,75.025 6.685,75.025 ccw(c6.686,72.024) 3.685,72.025 3.685,3.025

## Text inside footprints (layer, text, board x,y; h text height)
J6: F.SilkS "CARD ENTRY" at 23.513,73.598 h0.8
J7: F.SilkS "CARD ENTRY" at 66.513,73.598 h0.8
J11: Dwgs.User "PCB Edge" at 45.127,74.259 h0.5